# EAGLE board mirrored (EAGLE 9.6.2)
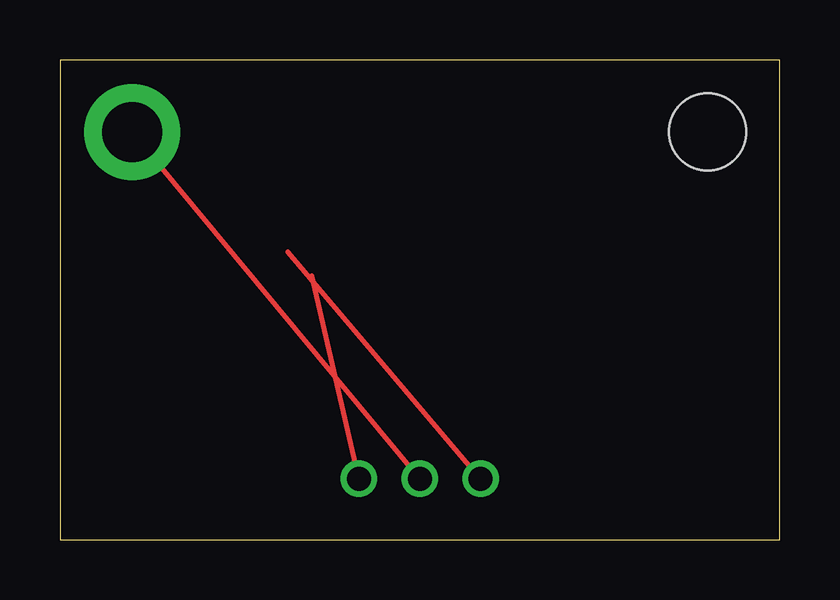
[diagram p0: board, top side]
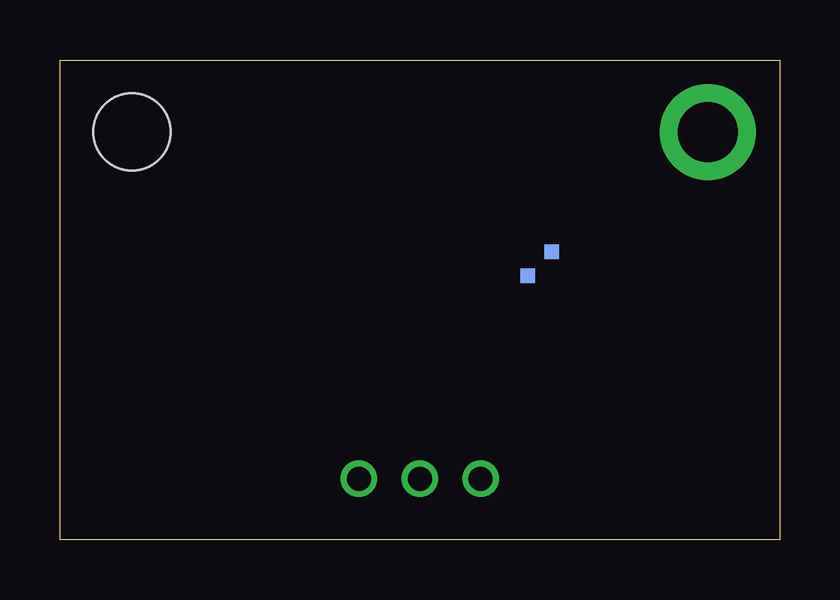
[diagram p1: board, bottom side, seen from below]

Size 30 x 20 mm. Coordinates in mm from the lower left corner, seen from the top.
Outline: 0,0 30,0 30,20 0,20 0,0
Copper layers used: layer 1
Holes 3.2 mm at 27,17

## Footprints (pad centres in the part's own frame; a part is rotated, then mirrored left to right if it is on the bottom)
MOUNTINGHOLE_2.5_PLATED = drill 2.5 pad 4: P$1 0,0
1X03 = drill 1: 1 -2.54,0; 2 0,0; 3 2.54,0
SMD2 = smd 0.6 x 0.6: A 1,0.5; B 2,-0.5

## Placement (x,y rotation side)
H1  [MOUNTINGHOLE_2.5_PLATED]  3,17 0 top
JP1  [1X03]  15,2.54 0 top
U1  CHIP  [SMD2]  10,10 90 bottom

## Library data of the parts
H1 JP1 U1 = fix

## Nets
GND: H1.P$1 JP1.2
SDA: JP1.3 U1.B
VCC: JP1.1 U1.A

## Tracks (layer width: path | path; a pad name or v marks a point on that pad's centre or on a via)
GND
  layer 1 0.2: JP1.2 H1.P$1
SDA
  layer 1 0.2: JP1.3 U1.B
VCC
  layer 1 0.2: JP1.1 U1.A